# Altium PCB Gear_Trak-v1.0.PcbDoc (part 2 of 5)
Units mil, origin at the board's own origin, x right, y up, seen from the top; angles counter-clockwise.
Board outline 1383 x 2953 mil, 6 copper layers (TOP LAYER, GROUND1, SIGNAL, GROUND2, POWER, BOTTOM LAYER), stack 60.865 mil thick; 166 components, 125 nets, 751 pads, 771 vias.
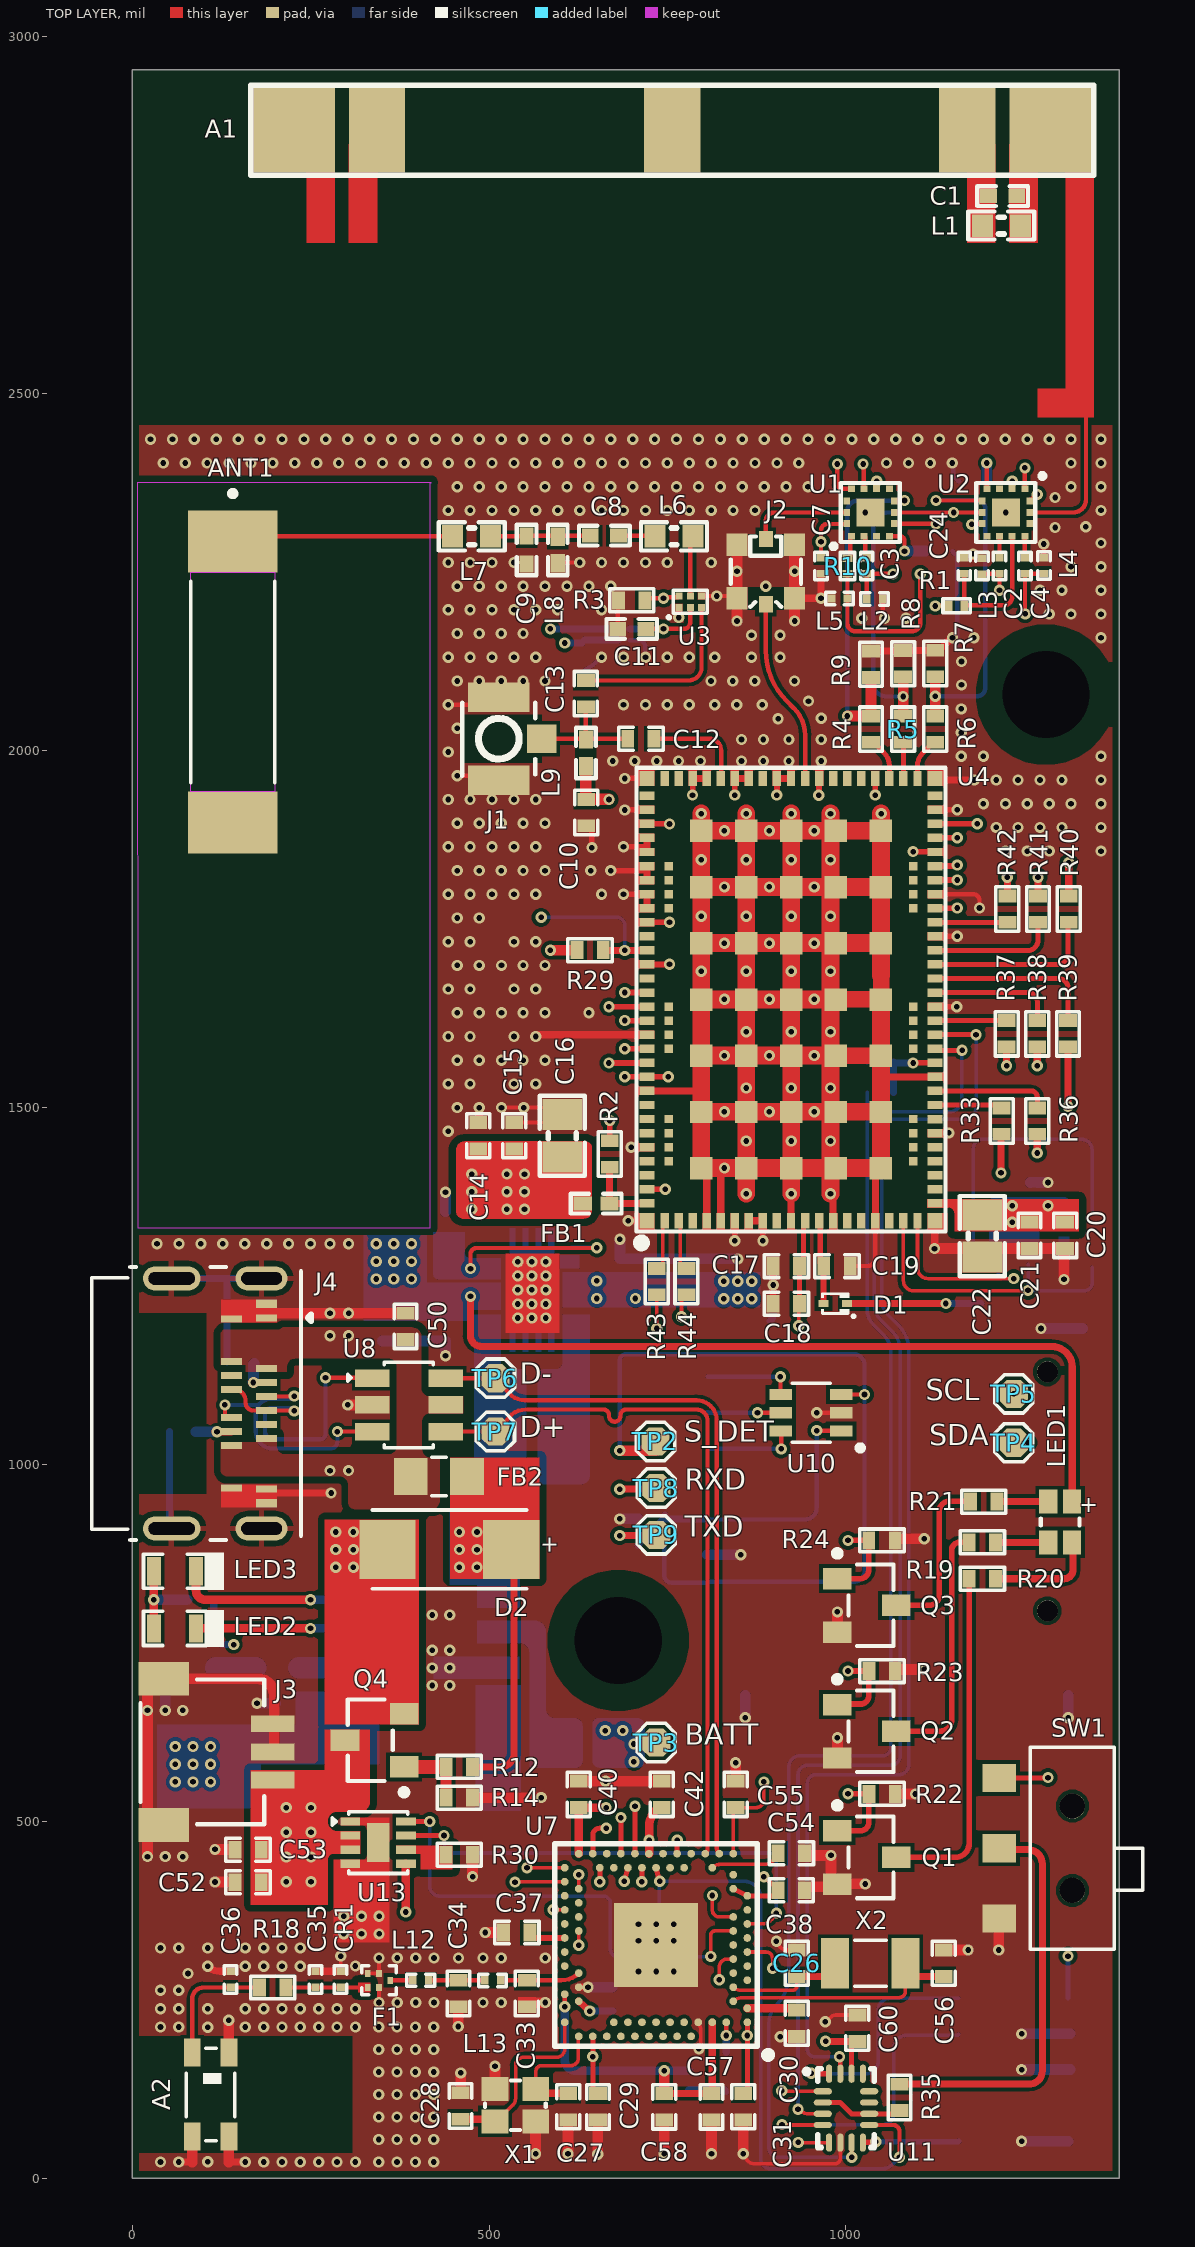
[diagram p0: TOP LAYER view]

## Part data (continued)
CR1: "ESD Suppressor, 30V, 0.04pF", Digikey Part Number=P122037CT-ND, LCSC="Not Available", Manufacturer=Panasonic, Part number IPS=00000004437, Artikkelnr Noca=N.A., Component Class=Semiconductors, ComponentLink1Description=Datasheet, ComponentLink1URL=https://industrial.panasonic.com/cdbs/www-data/pdf/AWD0000/AWD0000C13.pdf, ComponentLink2Description="Supplier link", ComponentLink2URL=N.A., Footprint Doc=0201, HelpURL=N.A., LatestRevisionDate=2020-04-28, Manufacturer Part Number=EZA-EG1N50AC, Note=N.A., Pad Count=2, PartId=101300173, Part Number=EZA-EG1N50AC, Published=2020-02-06, Supplier 1=Digi-Key, Supplier 2=N.A., Supplier Part Number 2=N.A.
D1: "20V schottky barrier diode, Vf 350 mV @ 100 mA, Ir 2.0 µA @ 10 V, If 500 mA", LCSC=C91106, Manufacturer="ON Semiconductor", Package=SOD-923, Part number IPS=00000009952, Supplier Part Number 1=NSR0620P2T5GOSCT-ND, Artikkelnr Noca=10029169, Component Class=Semiconductors, ComponentLink1Description=Datasheet, ComponentLink1URL=N.A., ComponentLink2Description="Supplier link", ComponentLink2URL=N.A., HelpURL=http://www.onsemi.com/pub_link/Collateral/NSR0620P2-D.PDF, LatestRevisionDate=2016-07-07, Manufacturer Part Number=NSR0620P2T5G, Note=N.A., Pad Count=2, PartId=101300131, Part Number=NSR0620P2T5G, Published=2016-07-07, Supplier 1=Digi-Key, Supplier 2=N.A., Supplier Part Number 2=N.A.
D2: library part "D Schottky", "Schottky Diode", LCSC=C22452
F1: "2.4 GHz BPF", LCSC=C910680, Manufacturer=Murata, Part number IPS="00000001784, 80000001660", Supplier Part Number 1=N.A., Artikkelnr Noca=N.A., Component Class=Filters, ComponentLink1Description=Datasheet, ComponentLink1URL=N.A., ComponentLink2Description="Supplier link", ComponentLink2URL=N.A., Footprint Doc=1109, HelpURL=N.A., LatestRevisionDate=2018-05-15, Manufacturer Part Number=SAFFB2G45MA0F0A, Note=N.A., Pad Count=5, PartId=100800023, Part Number=SAFFB2G45MA0F0A, Published=2018-05-15, Supplier 1=N.A., Supplier 2=N.A., Supplier Part Number 2=N.A.
FB1: library part FB0402-120R@100M-700mA, "Ferrite Bead, 120 Ohm @ 100MHz, 700mA, 130 mOhm Max", LCSC=C337873, Manufacturer=Murata, Manufacturer Part Number=BLM15AX121SN1, Package=0402, Part number IPS=00000004487, Supplier Part Number 1=490-5439-1-ND, Artikkelnr Noca=N.A., Component Class=Inductors, ComponentLink1Description=Datasheet, ComponentLink1URL=https://www.murata.com/en-us/products/productdata/8796740059166/ENFA0018.pdf, ComponentLink2Description="Supplier link", ComponentLink2URL=N.A., HelpURL=https://www.murata.com/products/productdetail?partno=BLM15AX121SN1%23, LatestRevisionDate=2020-04-28, Note=N.A., Pad Count=2, PartId=100300100, Part Number=FB0402-120R@100M-700mA, Published=2020-04-28, Supplier 1=Digi-Key, Supplier 2=N.A., Supplier Part Number 2=N.A.
FB2: "FERRITE BEAD 220 OHM 0805 1LN", Case Code (Imperial)=0805, Case Code (Metric)=2012, Current=2A, DC Resistance (DCR)=45mR, LCSC Part Number=C85840, Manufacturer=Murata, Max Operating Temperature=125°C, Min Operating Temperature=-55°C, Package Quantity=1, Test Frequency=100MHz, Tolerance=25%, Case/Package=0805, ComponentLink1Description=https://datasheet.ciiva.com/30514/1845321-30514028.pdf?src-supplier=Jameco, ComponentLink1URL=https://datasheet.ciiva.com/30514/1845321-30514028.pdf?src-supplier=Jameco, ComponentLink2Description=https://datasheet.ciiva.com/1012/l0110s0100blm21p-1012288.pdf?src-supplier=Digikey, ComponentLink2URL=https://datasheet.ciiva.com/1012/l0110s0100blm21p-1012288.pdf?src-supplier=Digikey, ComponentLink3Description=https://datasheet.ciiva.com/11799/0900766b81275e31-11799232.pdf?src-supplier=Rs, ComponentLink3URL=https://datasheet.ciiva.com/11799/0900766b81275e31-11799232.pdf?src-supplier=Rs, ComponentLink4Description=https://datasheet.ciiva.com/29348/442529-da-01-en-chip-drossel-0805-220r-2000ma-2-0x1-25mm-29348007.pdf?src-supplier=Conrad, ComponentLink4URL=https://datasheet.ciiva.com/29348/442529-da-01-en-chip-drossel-0805-220r-2000ma-2-0x1-25mm-29348007.pdf?src-supplier=Conrad, ComponentLink5Description=https://datasheet.ciiva.com/8021/1756152-8021596.pdf?src-supplier=Element14, ComponentLink5URL=https://datasheet.ciiva.com/8021/1756152-8021596.pdf?src-supplier=Element14, ComponentLink6Description=https://datasheet.ciiva.com/8021/1756152-8021598.pdf?src-supplier=Element14, ComponentLink6URL=https://datasheet.ciiva.com/8021/1756152-8021598.pdf?src-supplier=Element14, ComponentLink7Description=https://datasheet.ciiva.com/14122/anblm21p-data-e-14122214.pdf?src-supplier=Distrelec, ComponentLink7URL=https://datasheet.ciiva.com/14122/anblm21p-data-e-14122214.pdf?src-supplier=Distrelec, ComponentLink8Description=https://datasheet.ciiva.com/1012/l0110s0100blm21p-1012287.pdf?src-supplier=Digikey, ComponentLink8URL=https://datasheet.ciiva.com/1012/l0110s0100blm21p-1012287.pdf?src-supplier=Digikey, ComponentLink9Description=https://datasheet.ciiva.com/1012/l0110s0100blm21p-1012289.pdf?src-supplier=Digikey, ComponentLink9URL=https://datasheet.ciiva.com/1012/l0110s0100blm21p-1012289.pdf?src-supplier=Digikey, ComponentLink10Description=https://datasheet.ciiva.com/3081/l0110s0100blm21p-3081655.pdf?src-supplier=Avnet, ComponentLink10URL=https://datasheet.ciiva.com/3081/l0110s0100blm21p-3081655.pdf?src-supplier=Avnet, ComponentLink11Description=https://datasheet.ciiva.com/16215/l0110s0100blm21p-16215194.pdf?src-supplier=Future+Electronics, ComponentLink11URL=https://datasheet.ciiva.com/16215/l0110s0100blm21p-16215194.pdf?src-supplier=Future+Electronics, Core Material=Ferrite, Current Rating=2A, DC Current=2A, DC Resistance-Max=45mR, Depth=1.25mm, Height=0.85mm, Impedance=220R, Item Type="Ferrite Beads", Lead Free="Lead Free", Length=2mm, Manufacturer Part Number=BLM21PG221SN1D, Material=Steel,Ferrite, Max Current Rating=2A, Max DC Current=2A, Military Standard=Not, Number of Lines=1, Packaging="Tape and Reel", Pins=2, Pricing="4000=0.0243, 12000=0.0237, 20000=0.0234, 40000=0.0231, 80000=0.0225 (USD)", Radiation Hardening=No, Reach SVHC Compliant=No, RoHS=Yes, RoHS Compliant=Yes, Series=BLM21P, Stock=612000, Supplier="Future Electronics", Termination=SMD/SMT, Width=1.25mm
J1: library part 20279-001E-03, "Ultraminiature Coaxial Connector, 50 Ohm, SMD", Digikey Part Number=H11891CT-ND, LCSC=NILL, ComponentLink1Description=Datasheet, ComponentLink1URL=\\hizz\pro\app9717\Datasheet\connectors\Wellshow\20279C18.pdf, ComponentLink2Description="Supplier link", ComponentLink2URL=N.A.
J2: library part MM8130-2600, "Coaxial Connector with Switch", LCSC=C167503, ComponentLink1Description=Datasheet, ComponentLink1URL=N.A., ComponentLink2Description="Supplier link", ComponentLink2URL=N.A.
J3: library part SM03B-SRSS-TB, "1.0mm pitch connector side entry SMD", LCSC=C160403, ComponentLink1Description=Datasheet, ComponentLink1URL=N.A., ComponentLink2Description="Supplier link", ComponentLink2URL=N.A.
J4: "USB C RECEPTACLE, 16PIN", Contact Resistance=50mR, Current Rating=5A, Dielectric Material=4303ConductorMaterial, Insulation Resistance=100MR, Manufacturer=Molex, Max Operating Temperature=85°C, Min Operating Temperature=-40°C, Supplier Part Number=538-203615-0003, ComponentLink1Description=https://datasheet.octopart.com/203615-0003-Molex-datasheet-176111458.pdf?src-supplier=Farnell, ComponentLink1URL=https://datasheet.octopart.com/203615-0003-Molex-datasheet-176111458.pdf?src-supplier=Farnell, ComponentLink2Description=https://datasheet.octopart.com/203615-0003-Molex-datasheet-176111458.pdf?src-supplier=Element14, ComponentLink2URL=https://datasheet.octopart.com/203615-0003-Molex-datasheet-176111458.pdf?src-supplier=Element14, Contact Gender=30Gender, Item Type=Connectors, Manufacturer Part Number=203615-0003, Number of Ports=1NUMBER, Number of Rows=2NUMBER, Pins=16NUMBER, Plating Thickness=762nm, Pricing="1=3.44, 10=2.81, 50=2.43, 100=2.29, 1000=2.01, 10000=1.99 (USD)", Reach SVHC Compliant=4188SVHC, RoHS=No, Row Spacing=1.25mm, Shell Finish=153ConductorMaterial, Shell Material=156ConductorMaterial, Stock=9511, Supplier=Mouser, Terminal Pitch=500um
J5: "NanoSIM SMD SIM Card Connectors", Alternate Part Number=SIM8066-6-1-14-01-A, LCSC=C266888, Manufacturer=XUNPU, Manufacturer Part Number=SMN-303, Supplier 1=LCSC
L1: library part L0603-15n-Wirewound-Murata, "Inductor, 700mA, ±5%, 85mΩ, Q=42 @ 250MHz", LCSC=C341693, Package=0603, ComponentLink1Description=Datasheet, ComponentLink1URL=https://search.murata.co.jp/Ceramy/image/img/P02/JELF243A-0026.pdf, ComponentLink2Description="Supplier link", ComponentLink2URL=N.A.
L2: library part L0201-6n2-Wirewound-Murata, "Inductor, 360mA, ±5%, 220mOhm, Q=39", LCSC=C162624, Package=0201, ComponentLink1Description=Datasheet, ComponentLink1URL=https://search.murata.co.jp/Ceramy/image/img/P02/JELF243A-0109.pdf, ComponentLink2Description="Supplier link", ComponentLink2URL=N.A.
L3: library part L0201-6n2-Wirewound-Murata, "Inductor, 360mA, ±5%, 220mOhm, Q=39", LCSC=NILL, Package=0201, ComponentLink1Description=Datasheet, ComponentLink1URL=https://search.murata.co.jp/Ceramy/image/img/P02/JELF243A-0109.pdf, ComponentLink2Description="Supplier link", ComponentLink2URL=N.A.
L4: library part L0201-6n2-Wirewound-Murata, "Inductor, 360mA, ±5%, 220mOhm, Q=39", LCSC=C142508, Package=0201, ComponentLink1Description=Datasheet, ComponentLink1URL=https://search.murata.co.jp/Ceramy/image/img/P02/JELF243A-0109.pdf, ComponentLink2Description="Supplier link", ComponentLink2URL=N.A.
L5: library part L0201-6n2-Wirewound-Murata, "Inductor, 360mA, ±5%, 220mOhm, Q=39", LCSC=C237443, Package=0201, ComponentLink1Description=Datasheet, ComponentLink1URL=https://search.murata.co.jp/Ceramy/image/img/P02/JELF243A-0109.pdf, ComponentLink2Description="Supplier link", ComponentLink2URL=N.A.
L6: library part L0603-8n2-Wirewound-Murata, "Inductor, 800mA, ±0.5nH, 58mΩ, Q=38 @ 250MHz", LCSC=C98087, Manufacturer=Murata, Manufacturer Part Number=LQW18AN8N2D10, Package=0603, Part number IPS=00000003972, Supplier Part Number 1=490-6914-1-ND, Artikkelnr Noca=N.A., Component Class=Inductors, ComponentLink1Description=Datasheet, ComponentLink1URL=https://search.murata.co.jp/Ceramy/image/img/P02/JELF243A-0026.pdf, ComponentLink2Description="Supplier link", ComponentLink2URL=N.A., HelpURL=https://psearch.en.murata.com/inductor/product/LQW18AN8N2D10%23.html, LatestRevisionDate=2019-10-25, Note="-55°C ~ 125°C", Pad Count=2, PartId=100300394, Part Number=L0603-8n2-Wirewound-Murata, Published=2019-10-25, Supplier 1=Digi-Key, Supplier 2=N.A., Supplier Part Number 2=N.A.
L7: library part L0201-6n2-Wirewound-Murata, "Inductor, 360mA, ±5%, 220mOhm, Q=39", Digikey Part Number=490-LQW18AN11NG80DCT-ND, LCSC="Non Stock", Package=0603, ComponentLink1Description=Datasheet, ComponentLink1URL=https://search.murata.co.jp/Ceramy/image/img/P02/JELF243A-0109.pdf, ComponentLink2Description="Supplier link", ComponentLink2URL=N.A.
L8: library part L0201-6n2-Wirewound-Murata, "Inductor, 360mA, ±5%, 220mOhm, Q=39", LCSC=C412266, Package=0402, ComponentLink1Description=Datasheet, ComponentLink1URL=https://search.murata.co.jp/Ceramy/image/img/P02/JELF243A-0109.pdf, ComponentLink2Description="Supplier link", ComponentLink2URL=N.A.
L9: library part L0402-68n-Wirewound-Murata, "Inductor, 140mA, ±2%, 1960mΩ, Q=20", LCSC=C108965, Package=0402, ComponentLink1Description=Datasheet, ComponentLink1URL=https://search.murata.co.jp/Ceramy/image/img/P02/JELF243A-0050.pdf, ComponentLink2Description="Supplier link", ComponentLink2URL=N.A.
L10: library part XFL4020-102MEC, "FIXED IND 1UH 11A 11.9MOHM SM", Case/Package=SMD/SMT, Inductance Tolerance=20%, LCSC Part Number=C5355380, Manufacturer=Coilcraft, Max DC Current=11A, Max Operating Temperature=125°C, Min Operating Temperature=-40°C, Saturation Current=4.5A, Self Resonant Frequency=64MHz, Supplier Part Number=994-XFL4020-102MEC, Test Frequency=100kHz, Category="Fixed Inductors", ComponentLink1Description=https://datasheet.ciiva.com/22679/1682010-22679273.pdf?src-supplier=Element14, ComponentLink1URL=https://datasheet.ciiva.com/22679/1682010-22679273.pdf?src-supplier=Element14, ComponentLink2Description=https://datasheet.ciiva.com/22679/1682010-22679274.pdf?src-supplier=Element14, ComponentLink2URL=https://datasheet.ciiva.com/22679/1682010-22679274.pdf?src-supplier=Element14, ComponentLink3Description=https://datasheet.ciiva.com/13168/xfl4020-13168079.pdf?src-supplier=Mouser, ComponentLink3URL=https://datasheet.ciiva.com/13168/xfl4020-13168079.pdf?src-supplier=Mouser, Core Material=Composite, ESR=11.9mR, Height=2.1mm, Item Type=Inductor, Lead Free="Contains Lead", Length=4.3mm, Manufacturer Part Number=XFL4020-102MEC, Mounting Technology="Surface Mount", Packaging="Tape and Reel", Pricing="1=2.68, 10=2.68, 50=2.68, 100=2.68, 1000=1.01, 10000=1.01 (USD)", Reach SVHC Compliant=No, RMS Current (Irms)=11A, RoHS=Yes, RoHS Compliant=Yes, Series=XFL4020, Shielding=Shielded, Stock=12821, Supplier=Mouser, Termination=SMD/SMT, Tolerance=20%, Width=4.3mm
L11: library part YSPI0520-2R2M, "4A 2.2uH ±20% 32mΩ SMD,5.4x5.2x2mm Power Inductors ROHS", LCSC Part Number=C718375, Manufacturer=YJYCOIN, ComponentLink1Description=LCSC, ComponentLink1URL=https://www.lcsc.com/product-detail/Power-Inductors_YJYCOIN-YSPI0520-2R2M_C718375.html, Item Type=Inductor, Manufacturer Part Number=YSPI0520-2R2M
L12: library part L0201-3n9, "Inductor, 400mA, ±0.1nH", LCSC=C90191, Manufacturer=Murata, Manufacturer Part Number=LQP03TN3N9B02D, Part number IPS=00000001253, Supplier Part Number 1=N.A., Artikkelnr Noca=N.A., Component Class=Inductors, ComponentLink1Description=Datasheet, ComponentLink1URL=N.A., ComponentLink2Description="Supplier link", ComponentLink2URL=N.A., Footprint Doc=0201, HelpURL=N.A., LatestRevisionDate=2017-11-09, Note=N.A., Pad Count=2, PartId=100300022, Part Number=L0201-3n9, Published=2013-04-10, Supplier 1=N.A., Supplier 2=N.A., Supplier Part Number 2=N.A.
L13: library part L0201-4n7, "Inductor, 350mA, ±3%", LCSC=C86126, Package=0201, ComponentLink1Description=Datasheet, ComponentLink1URL=N.A., ComponentLink2Description="Supplier link", ComponentLink2URL=N.A.
L14: library part LQG15HN15NJ02D, "FIXED IND 15NH 400MA 0.45OHM SMD", Case Code (Imperial)=0402, Case Code (Metric)=1005, Current Rating=300mA, DC Resistance (DCR)=460mR, Inductance Tolerance=5%, LCSC Part Number=C97979, Manufacturer=Murata, Max Operating Temperature=125°C, Min Operating Temperature=-55°C, Package Quantity=1, Self Resonant Frequency=2.3GHz, Test Frequency=100MHz, Case/Package=0402, ComponentLink1Description=https://datasheet.ciiva.com/11801/0900766b80f10808-11801397.pdf?src-supplier=Rs, ComponentLink1URL=https://datasheet.ciiva.com/11801/0900766b80f10808-11801397.pdf?src-supplier=Rs, ComponentLink2Description=https://datasheet.ciiva.com/8002/66026-8002488.pdf?src-supplier=Element14, ComponentLink2URL=https://datasheet.ciiva.com/8002/66026-8002488.pdf?src-supplier=Element14, ComponentLink3Description=https://datasheet.ciiva.com/29696/l0075s0083lqg15hn-29696702.pdf?src-supplier=Digikey, ComponentLink3URL=https://datasheet.ciiva.com/29696/l0075s0083lqg15hn-29696702.pdf?src-supplier=Digikey, ComponentLink4Description=https://datasheet.ciiva.com/1063/l0075s0083lqg15hn-1063850.pdf?src-supplier=Digikey, ComponentLink4URL=https://datasheet.ciiva.com/1063/l0075s0083lqg15hn-1063850.pdf?src-supplier=Digikey, ComponentLink5Description=https://datasheet.ciiva.com/29696/l0075s0083lqg15hn-29696703.pdf?src-supplier=Digikey, ComponentLink5URL=https://datasheet.ciiva.com/29696/l0075s0083lqg15hn-29696703.pdf?src-supplier=Digikey, Core Material=Air, DC Current=300mA, Depth=0.55mm, ESR=450mR, Height=0.5mm, Height - Seated (Max)=0.022inch, Item Type=Inductor, Length=0.039inch, Manufacturer Part Number=LQG15HN15NJ02D, Max Current Rating=300mA, Max DC Current=300mA, Military Standard=Not, Mounting Technology="Surface Mount", Packaging="Tape and Reel", Pricing="1=0.1, 10=0.037, 50=0.037, 100=0.029, 1000=0.022, 10000=0.018 (USD)", Q Factor=8, Reach SVHC Compliant=No, RoHS=Yes, RoHS Compliant=Yes, Series=LQG15HS, Shielding=Unshielded, Stock=45308, Supplier=Mouser, Termination=SMD/SMT, Tolerance=5%, Width=0.02inch
L15: library part MLZ1608M100WT000, "FIXED IND 10UH 250MA 1.05OHM SMD", Case Code (Imperial)=0603, Case Code (Metric)=1608, Current Rating=250mA, DC Resistance (DCR)=1.365R, LCSC Part Number=C76798, Manufacturer=TDK, Max Operating Temperature=125°C, Min Operating Temperature=-55°C, Package Quantity=4000, Saturation Current=90mA, Self Resonant Frequency=50MHz, Test Frequency=2MHz, Tolerance=20%, Case/Package=0603, ComponentLink1Description=https://product.tdk.com/info/en/catalog/datasheets/inductor_commercial_decoupling_mlz1608_en.pdf?src-supplier=Digikey, ComponentLink1URL=https://product.tdk.com/info/en/catalog/datasheets/inductor_commercial_decoupling_mlz1608_en.pdf?src-supplier=Digikey, ComponentLink2Description=https://datasheet.octopart.com/MLZ1608M100WT000-TDK-datasheet-12356712.pdf?src-supplier=Newark, ComponentLink2URL=https://datasheet.octopart.com/MLZ1608M100WT000-TDK-datasheet-12356712.pdf?src-supplier=Newark, ComponentLink3Description=https://datasheet.octopart.com/MLZ1608M100WT000-TDK-datasheet-38159369.pdf?src-supplier=Future+Electronics, ComponentLink3URL=https://datasheet.octopart.com/MLZ1608M100WT000-TDK-datasheet-38159369.pdf?src-supplier=Future+Electronics, Core Material=Ferrite, ESR=1.05R, Height=950um, Height - Seated (Max)=0.037inch, Item Type=Inductors, Length=0.063inch, Manufacturer Part Number=MLZ1608M100WT000, Mounting Technology="Surface Mount", Packaging="Cut Tape", Pricing="1=0.14, 10=0.09, 25=0.0804, 50=0.0706, 100=0.0617, 250=0.05292 (USD)", RMS Current (Irms)=250mA, RoHS=Yes, RoHS Compliant=Yes, Series=MLZ, Shielding=Shielded, Stock=146199, Supplier=Digikey, Width=0.031inch
LED1: library part LTST-C19HE1WT, LCSC=C458749
LED2: library part NCD0603G2, "Emerald 0603 Light Emitting Diodes (LED) ROHS", LCSC Part Number=C87326, Manufacturer="Foshan NationStar Optoelectronics", Package=0603, ComponentLink1Description=LCSC, ComponentLink1URL=https://www.lcsc.com/product-detail/Light-Emitting-Diodes-LED_Foshan-NationStar-Optoelectronics-NCD0603G2_C87326.html, Item Type=LED, Manufacturer Part Number=NCD0603G2
LED3: library part NCD0603R3, "RED LED 0603 Light Emitting Diodes", LCSC Part Number=C3151730, Manufacturer="Foshan NationStar Optoelectronics", Package=0603, ComponentLink1Description=LCSC, ComponentLink1URL=https://www.lcsc.com/product-detail/Light-Emitting-Diodes-LED_Foshan-NationStar-Optoelectronics-NCD0603R3_C3151730.html, Item Type=LED, Manufacturer Part Number=NCD0603R3
P1: "CONN RCPT 10POS 0.05 GOLD SMD", Color=46Colour, Contact Resistance=30mR, Current Rating=1A, Insulation Resistance=100MR, LCSC Part Number=C598542, Manufacturer="Amphenol Communications Solutions", Max Operating Temperature=125°C, Max Voltage Rating (AC)=125V, Min Operating Temperature=-55°C, ComponentLink1Description=https://datasheet.octopart.com/20021321-00010C4LF-FCI-datasheet-27119701.pdf?src-supplier=Newark, ComponentLink1URL=https://datasheet.octopart.com/20021321-00010C4LF-FCI-datasheet-27119701.pdf?src-supplier=Newark, ComponentLink2Description=https://datasheet.octopart.com/20021321-00010C4LF-Amphenol-Communications-Solutions-datasheet-98396828.pdf?src-supplier=Element14, ComponentLink2URL=https://datasheet.octopart.com/20021321-00010C4LF-Amphenol-Communications-Solutions-datasheet-98396828.pdf?src-supplier=Element14, ComponentLink3Description=https://datasheet.octopart.com/20021321-00010C4LF-FCI-datasheet-21379677.pdf?src-supplier=Farnell, ComponentLink3URL=https://datasheet.octopart.com/20021321-00010C4LF-FCI-datasheet-21379677.pdf?src-supplier=Farnell, ComponentLink4Description=https://datasheet.octopart.com/20021321-00010C4LF-Amphenol-Communications-Solutions-datasheet-100449241.pdf?src-supplier=TME, ComponentLink4URL=https://datasheet.octopart.com/20021321-00010C4LF-Amphenol-Communications-Solutions-datasheet-100449241.pdf?src-supplier=TME, Connector Type=4640ConnectorType, Contact Material=153,157ConductorMaterial, Contact Plating=157ConductorMaterial, Depth=3mm, Gender=4472Gender, Height=4.75mm, Housing Color=46Colour, Housing Material=4896ConductorMaterial, Item Type="Headers and Wire Housings", Lead Free=5697LeadFree, Length=13.16mm, Manufacturer Part Number=20021321-00010C4LF, Mounting Technology=8Mount, Number of Contacts=10NUMBER, Number of Positions=10NUMBER, Number of Rows=2NUMBER, Packaging=10Packaging, Pins=10NUMBER, Pitch=1.27mm, Pricing="1=1.13, 10=0.963, 100=0.8184 (USD)", Reach SVHC Compliant=4186SVHC, RoHS=No, Row Spacing=1.27mm, Stack Height=4.3mm, Stock=9747, Supplier=Digikey, Termination=4558ConnectorType, Voltage Rating=125V
Q1 Q2 Q3: library part NMOS-2, "30V 5.8A 35mΩ@10V,5.8A 350mW N Channel SOT-23 MOSFETs ROHS", LCSC=C181090, ComponentLink1Description="Manufacturer Link", ComponentLink1URL=http://www.irf.com/
Q4: library part PMOS-2, "P-Channel Power MOSFET", LCSC=C6903, ComponentLink1Description="Manufacturer Link", ComponentLink1URL=http://www.irf.com/
R1 R10: library part RC0201JR-070RL, "RES SMD 0 OHM JUMPER 1/20W 0201", Case Code (Imperial)=0201, Case Code (Metric)=0603, LCSC Part Number=C106228, Manufacturer=Yageo, Max Operating Temperature=125°C, Max Power Dissipation=50mW, Min Operating Temperature=-55°C, Package Quantity=10000, Resistance Tolerance=5%, Resistor Type="Thick Film", Supplier Part Number 1=311-0.0NCT-ND, Voltage Rating=25V, Case/Package=0201, Category="Chip SMD Resistors", ComponentLink1Description=https://datasheet.ciiva.com/7672/1563626-7672247.pdf?src-supplier=Element14, ComponentLink1URL=https://datasheet.ciiva.com/7672/1563626-7672247.pdf?src-supplier=Element14, ComponentLink2Description=https://datasheet.ciiva.com/7660/1421516-7660808.pdf?src-supplier=Element14, ComponentLink2URL=https://datasheet.ciiva.com/7660/1421516-7660808.pdf?src-supplier=Element14, ComponentLink3Description=https://datasheet.ciiva.com/7672/1563626-7672248.pdf?src-supplier=Element14, ComponentLink3URL=https://datasheet.ciiva.com/7672/1563626-7672248.pdf?src-supplier=Element14, ComponentLink4Description=https://datasheet.ciiva.com/16855/pyu-rc0201-51-rohs-l-8-16855994.pdf?src-supplier=Avnet+Europe, ComponentLink4URL=https://datasheet.ciiva.com/16855/pyu-rc0201-51-rohs-l-8-16855994.pdf?src-supplier=Avnet+Europe, ComponentLink5Description=https://datasheet.ciiva.com/28419/pyu-rc0201-51-rohs-l-8-28419660.pdf?src-supplier=Avnet+Europe, ComponentLink5URL=https://datasheet.ciiva.com/28419/pyu-rc0201-51-rohs-l-8-28419660.pdf?src-supplier=Avnet+Europe, ComponentLink6Description=https://datasheet.ciiva.com/46391/1421516-46391340.pdf?src-supplier=Element14, ComponentLink6URL=https://datasheet.ciiva.com/46391/1421516-46391340.pdf?src-supplier=Element14, ComponentLink7Description=https://datasheet.ciiva.com/8896/pyu-rc0201-51-rohs-l-8-8896143.pdf?src-supplier=Avnet, ComponentLink7URL=https://datasheet.ciiva.com/8896/pyu-rc0201-51-rohs-l-8-8896143.pdf?src-supplier=Avnet, Construction=Rectangular, Contact Plating=Tin,Matte, Depth=0.3mm, Features="Moisture Resistant", Height=0.01inch, Lead Free="Lead Free", Length=0.6mm, Manufacturer Part Number=RC0201JR-070RL, Military Standard=Not, Number of Terminations=2, Packaging="Tape and Reel", Power Rating=50mW, Pricing 1="1=0.10000, 10=0.03600, 25=0.02640, 50=0.02000, 100=0.01480, 250=0.01128, 500=0.00904, 1000=0.00665, 5000=0.00477 (USD)", Radiation Hardening=No, REACH SVHC=Unknown, Resistance=0R, RoHS=Yes, RoHS Compliant=Yes, Series=RC, Size Code=0201, Stock 1=11079, Supplier 1=Digi-Key, Termination=SMD/SMT, Tolerance=5%, Voltage Rating (DC)=25V, Weight=6E-06oz, Width=0.012inch
R2 R29 R30: library part RC0402FR-0710KL, "RES 10K OHM 1% 1/16W 0402", Case Code (Imperial)=0402, Case Code (Metric)=1005, LCSC Part Number=C60490, Manufacturer=Yageo, Max Operating Temperature=155°C, Max Power Dissipation=63mW, Min Operating Temperature=-55°C, Power Rating=62.5mW, Resistance=10kR, Resistance Tolerance=1%, Resistor Type="Thick Film", Supplier Part Number 1=603-RC0402FR-0710KL, Temperature Coefficient=100ppm/°C, Voltage Rating=50V, Case/Package=0402, Category="Chip SMD Resistors", ComponentLink1Description=https://datasheet.ciiva.com/7660/38568-7660787.pdf?src-supplier=Element14, ComponentLink1URL=https://datasheet.ciiva.com/7660/38568-7660787.pdf?src-supplier=Element14, ComponentLink2Description=https://datasheet.ciiva.com/7849/1686128-7849814.pdf?src-supplier=Element14, ComponentLink2URL=https://datasheet.ciiva.com/7849/1686128-7849814.pdf?src-supplier=Element14, ComponentLink3Description=https://datasheet.ciiva.com/7983/1018594-7983486.pdf?src-supplier=Element14, ComponentLink3URL=https://datasheet.ciiva.com/7983/1018594-7983486.pdf?src-supplier=Element14, ComponentLink4Description=https://datasheet.ciiva.com/22747/1018594-22747512.pdf?src-supplier=Element14, ComponentLink4URL=https://datasheet.ciiva.com/22747/1018594-22747512.pdf?src-supplier=Element14, ComponentLink5Description=https://datasheet.ciiva.com/12667/pyu-rc0402-51-rohs-l-6-r-12667067.pdf?src-supplier=Mouser, ComponentLink5URL=https://datasheet.ciiva.com/12667/pyu-rc0402-51-rohs-l-6-r-12667067.pdf?src-supplier=Mouser, ComponentLink6Description=https://datasheet.ciiva.com/7849/1784430-7849813.pdf?src-supplier=Element14, ComponentLink6URL=https://datasheet.ciiva.com/7849/1784430-7849813.pdf?src-supplier=Element14, ComponentLink7Description=https://datasheet.ciiva.com/7849/1784430-7849815.pdf?src-supplier=Element14, ComponentLink7URL=https://datasheet.ciiva.com/7849/1784430-7849815.pdf?src-supplier=Element14, Construction=Rectangular, Depth=0.5mm, Features="Moisture Resistant", Height=0.32mm, Item Type=Resistor, Lead Free="Lead Free", Lead Pitch=0.2mm, Length=1mm, Manufacturer Part Number=RC0402FR-0710KL, Military Standard=Not, Number of Pins=2, Number of Terminations=2, Packaging="Tape and Reel", Pricing 1="1=0.10000, 10=0.01400, 50=0.01400, 100=0.00500, 1000=0.00300, 10000=0.00200 (USD)", REACH SVHC="No SVHC", RoHS=Yes, RoHS Compliant=Yes, Series=RC, Stock 1=18648329, Supplier 1=Mouser, Termination=SMD/SMT, Tolerance=1%, Voltage Rating (DC)=50V, Width=0.5mm, Working Voltage=50V
R3 R14 R17 R22 R23 R24 R34 R35: library part RC0402FR-07100KL, "RES 100K OHM 1% 1/16W 0402", Case Code (Imperial)=0402, Case Code (Metric)=1005, LCSC Part Number=C60491, Manufacturer=Yageo, Max Operating Temperature=155°C, Max Power Dissipation=63mW, Min Operating Temperature=-55°C, Package Quantity=1, Resistance=100kR, Resistance Tolerance=1%, Resistor Type="Thick Film", Supplier Part Number 1=603-RC0402FR-07100KL, Temperature Coefficient=100ppm/°C, Voltage Rating=50V, Case/Package=0402, Category="Chip SMD Resistors", ComponentLink1Description=https://datasheet.ciiva.com/11819/0900766b80c66297-11819452.pdf?src-supplier=RSComponents, ComponentLink1URL=https://datasheet.ciiva.com/11819/0900766b80c66297-11819452.pdf?src-supplier=RSComponents, ComponentLink2Description=https://datasheet.ciiva.com/22747/1018594-22747509.pdf?src-supplier=Element14, ComponentLink2URL=https://datasheet.ciiva.com/22747/1018594-22747509.pdf?src-supplier=Element14, ComponentLink3Description=https://datasheet.ciiva.com/2453/pyu-r-int-thick-7-2453362.pdf?src-supplier=Digi-Key, ComponentLink3URL=https://datasheet.ciiva.com/2453/pyu-r-int-thick-7-2453362.pdf?src-supplier=Digi-Key, ComponentLink4Description=https://datasheet.ciiva.com/2453/pyu-r-int-thick-7-2453363.pdf?src-supplier=Digi-Key, ComponentLink4URL=https://datasheet.ciiva.com/2453/pyu-r-int-thick-7-2453363.pdf?src-supplier=Digi-Key, ComponentLink5Description=https://datasheet.ciiva.com/2453/pyu-r-int-thick-7-2453361.pdf?src-supplier=Digi-Key, ComponentLink5URL=https://datasheet.ciiva.com/2453/pyu-r-int-thick-7-2453361.pdf?src-supplier=Digi-Key, ComponentLink6Description=https://datasheet.ciiva.com/12667/pyu-rc0402-51-rohs-l-6-r-12667930.pdf?src-supplier=Mouser, ComponentLink6URL=https://datasheet.ciiva.com/12667/pyu-rc0402-51-rohs-l-6-r-12667930.pdf?src-supplier=Mouser, ComponentLink7Description=https://datasheet.ciiva.com/15189/getdatasheetpartid-323696-15189334.pdf?src-supplier=Verical, ComponentLink7URL=https://datasheet.ciiva.com/15189/getdatasheetpartid-323696-15189334.pdf?src-supplier=Verical, Construction=Rectangular, Depth=0.5mm, Features="Moisture Resistant", Height=0.016inch, Item Type=Resistor, Lead Free="Lead Free", Length=0.039inch, Manufacturer Part Number=RC0402FR-07100KL, Military Standard=Not, Number of Terminations=2, Packaging="Tape and Reel", Power Rating=63mW, Pricing 1="1=0.10000, 10=0.01200, 50=0.01200, 100=0.00500, 1000=0.00300, 2500=0.00200, 10000=0.00100 (USD)", REACH SVHC="No SVHC", RoHS=Yes, RoHS Compliant=Yes, Series=RC, Stock 1=7759549, Supplier 1=Mouser, Technology="THICK FILM", Termination=SMD/SMT, Tolerance=1%, Width=0.02inch, Working Voltage=50V
R4 R5 R6 R13 R25: library part RC0402FR-071KL, "RES 1K OHM 1% 1/16W 0402", Case Code (Imperial)=0402, Case Code (Metric)=1005, LCSC Part Number=C106235, Manufacturer=Yageo, Max Operating Temperature=155°C, Max Power Dissipation=63mW, Min Operating Temperature=-55°C, Power Rating=62.5mW, Resistance=1kR, Resistance Tolerance=1%, Resistor Type="Thick Film", Temperature Coefficient=100ppm/°C, Voltage Rating=50V, Case/Package=0402, Category="Chip SMD Resistors", ComponentLink1Description=https://datasheet.ciiva.com/11819/0900766b80c66297-11819477.pdf?src-supplier=RSComponents, ComponentLink1URL=https://datasheet.ciiva.com/11819/0900766b80c66297-11819477.pdf?src-supplier=RSComponents, ComponentLink2Description=https://datasheet.ciiva.com/7983/1018594-7983502.pdf?src-supplier=Element14, ComponentLink2URL=https://datasheet.ciiva.com/7983/1018594-7983502.pdf?src-supplier=Element14, ComponentLink3Description=https://datasheet.ciiva.com/22747/1018594-22747513.pdf?src-supplier=Element14, ComponentLink3URL=https://datasheet.ciiva.com/22747/1018594-22747513.pdf?src-supplier=Element14, ComponentLink4Description=https://datasheet.ciiva.com/12666/pyu-rc0402-51-rohs-l-6-r-12666741.pdf?src-supplier=Mouser, ComponentLink4URL=https://datasheet.ciiva.com/12666/pyu-rc0402-51-rohs-l-6-r-12666741.pdf?src-supplier=Mouser, ComponentLink5Description=https://datasheet.ciiva.com/7849/1018594-7849869.pdf?src-supplier=Element14, ComponentLink5URL=https://datasheet.ciiva.com/7849/1018594-7849869.pdf?src-supplier=Element14, ComponentLink6Description=https://datasheet.ciiva.com/7849/1018594-7849871.pdf?src-supplier=Element14, ComponentLink6URL=https://datasheet.ciiva.com/7849/1018594-7849871.pdf?src-supplier=Element14, ComponentLink7Description=https://datasheet.ciiva.com/17063/pyu-rc0402-51-rohs-l-6-r-17063193.pdf?src-supplier=Future+Electronics, ComponentLink7URL=https://datasheet.ciiva.com/17063/pyu-rc0402-51-rohs-l-6-r-17063193.pdf?src-supplier=Future+Electronics, Construction=Rectangular, Depth=0.5mm, Features="Moisture Resistant", Height=0.32mm, Item Type=Resistor, Lead Free="Lead Free", Length=1mm, Manufacturer Part Number=RC0402FR-071KL, Military Standard=Not, Number of Pins=2, Number of Terminations=2, Packaging="Tape and Reel", Pricing 1="10000=0.00085, 20000=0.00087, 40000=0.00084, 60000=0.00083, 80000=0.00079, 100000=0.00078, 1000000=0.00076 (USD)", Reach SVHC Compliant=Yes, RoHS=Yes, RoHS Compliant=Yes, Series=RC, Size Code=0402, Stock 1=13030000, Supplier 1=Avnet, Supplier Part Number 1=RC0402FR-071KL, Technology="THICK FILM", Termination=SMD/SMT, Tolerance=1%, Voltage Rating (DC)=50V, Width=0.5mm
R7 R8 R9: library part RC0402FR-071ML, "RES 1M OHM 1% 1/16W 0402", Case Code (Imperial)=0402, Case Code (Metric)=1005, LCSC Part Number=C138033, Manufacturer=Yageo, Max Operating Temperature=155°C, Max Power Dissipation=63mW, Min Operating Temperature=-55°C, Resistance Tolerance=1%, Resistor Type="Thick Film", Supplier Part Number=311-1.00MLRCT-ND, Temperature Coefficient=100ppm/°C, Voltage Rating=50V, Case/Package=0402, Category="Chip SMD Resistors", ComponentLink1Description=https://datasheet.ciiva.com/11808/0900766b80c66297-11808125.pdf?src-supplier=Rs, ComponentLink1URL=https://datasheet.ciiva.com/11808/0900766b80c66297-11808125.pdf?src-supplier=Rs, ComponentLink2Description=https://datasheet.ciiva.com/46394/1018594-46394951.pdf?src-supplier=Element14, ComponentLink2URL=https://datasheet.ciiva.com/46394/1018594-46394951.pdf?src-supplier=Element14, ComponentLink3Description=https://datasheet.ciiva.com/7849/1018594-7849883.pdf?src-supplier=Element14, ComponentLink3URL=https://datasheet.ciiva.com/7849/1018594-7849883.pdf?src-supplier=Element14, ComponentLink4Description=https://datasheet.ciiva.com/7849/1018594-7849882.pdf?src-supplier=Element14, ComponentLink4URL=https://datasheet.ciiva.com/7849/1018594-7849882.pdf?src-supplier=Element14, ComponentLink5Description=https://datasheet.ciiva.com/16741/pyu-rc0402-51-rohs-l-6-r-16741081.pdf?src-supplier=Future+Electronics, ComponentLink5URL=https://datasheet.ciiva.com/16741/pyu-rc0402-51-rohs-l-6-r-16741081.pdf?src-supplier=Future+Electronics, Construction=Rectangular, Depth=0.5mm, Features="Moisture Resistant", Height=0.32mm, Item Type=Resistor, Lead Free=5697LeadFree, Length=1mm, Manufacturer Part Number=RC0402FR-071ML, Military Standard=Not, Number of Terminations=2, Packaging="Tape and Reel", Power Rating=63mW, Pricing="1=0.1, 10=0.015, 50=0.0088, 100=0.0073, 500=0.00488, 1000=0.00417, 5000=0.00297 (USD)", Reach SVHC Compliant=Unknown, RoHS=Yes, RoHS Compliant=Yes, Series=RC, Stock=6516, Supplier=Digikey, Technology="THICK FILM", Termination=SMD/SMT, Tolerance=1%, Voltage Rating (AC)=50V
R11 R33 R36 R37 R38 R39 R40 R41 R42: library part RC0402FR-070RL, "RES 0 OHM JUMPER 1/16W 0402", Case Code (Imperial)=0402, Case Code (Metric)=1005, LCSC Part Number=C106231, Manufacturer=Yageo, Max Operating Temperature=155°C, Max Power Dissipation=63mW, Min Operating Temperature=-55°C, Power Rating=62.5mW, Resistance=0R, Resistor Type="Thick Film", Supplier Part Number 1=603-RC0402FR-070RL, Temperature Coefficient=200ppm/°C, Tolerance=1%, Voltage Rating=50V, Case/Package=0402, ComponentLink1Description=https://datasheet.ciiva.com/8896/pyu-rc0402-51-rohs-l-6-8896149.pdf?src-supplier=Avnet, ComponentLink1URL=https://datasheet.ciiva.com/8896/pyu-rc0402-51-rohs-l-6-8896149.pdf?src-supplier=Avnet, ComponentLink2Description=https://datasheet.ciiva.com/16790/pyu-rc0402-51-rohs-l-6-r-16790444.pdf?src-supplier=Future+Electronics, ComponentLink2URL=https://datasheet.ciiva.com/16790/pyu-rc0402-51-rohs-l-6-r-16790444.pdf?src-supplier=Future+Electronics, Contact Plating=Tin,Matte, Features="Moisture Resistant", Height=0.35mm, Item Type=Resistors, Lead Free="Lead Free", Length=1mm, Manufacturer Part Number=RC0402FR-070RL, Mount="Surface Mount", Number of Terminations=2, Packaging="Tape and Reel", Pricing 1="1=0.10000, 10=0.01400, 50=0.01400, 100=0.00600, 1000=0.00300, 5000=0.00200, 10000=0.00100 (USD)", Radiation Hardening=No, RoHS=Yes, RoHS Compliant=Yes, Series=RC, Size Code=0402, Stock 1=8556842, Supplier 1=Mouser, Termination=SMD/SMT, Width=0.5mm
R12: library part RC0402FR-0747KL, "RES 47K OHM 1% 1/16W 0402", Case Code (Imperial)=0402, Case Code (Metric)=1005, LCSC Part Number=C93943, Manufacturer=Yageo, Max Operating Temperature=155°C, Max Power Dissipation=63mW, Min Operating Temperature=-55°C, Package Quantity=1, Power Rating=62.5mW, Resistance=47kR, Resistance Tolerance=1%, Resistor Type="Thick Film", Temperature Coefficient=100ppm/°C, Voltage Rating=50V, Case/Package=0402, Category="Chip SMD Resistors", ComponentLink1Description=https://datasheet.ciiva.com/46412/1018594-46412839.pdf?src-supplier=Element14, ComponentLink1URL=https://datasheet.ciiva.com/46412/1018594-46412839.pdf?src-supplier=Element14, ComponentLink2Description=https://datasheet.ciiva.com/2453/pyu-r-int-thick-7-2453389.pdf?src-supplier=Digi-Key, ComponentLink2URL=https://datasheet.ciiva.com/2453/pyu-r-int-thick-7-2453389.pdf?src-supplier=Digi-Key, ComponentLink3Description=https://datasheet.ciiva.com/2453/pyu-r-int-thick-7-2453390.pdf?src-supplier=Digi-Key, ComponentLink3URL=https://datasheet.ciiva.com/2453/pyu-r-int-thick-7-2453390.pdf?src-supplier=Digi-Key, ComponentLink4Description=https://datasheet.ciiva.com/2453/pyu-r-int-thick-7-2453388.pdf?src-supplier=Digi-Key, ComponentLink4URL=https://datasheet.ciiva.com/2453/pyu-r-int-thick-7-2453388.pdf?src-supplier=Digi-Key, ComponentLink5Description=https://datasheet.ciiva.com/15189/getdatasheetpartid-323748-15189466.pdf?src-supplier=Verical, ComponentLink5URL=https://datasheet.ciiva.com/15189/getdatasheetpartid-323748-15189466.pdf?src-supplier=Verical, ComponentLink6Description=https://datasheet.ciiva.com/16793/pyu-rc0402-51-rohs-l-6-r-16793430.pdf?src-supplier=Future+Electronics, ComponentLink6URL=https://datasheet.ciiva.com/16793/pyu-rc0402-51-rohs-l-6-r-16793430.pdf?src-supplier=Future+Electronics, Construction=Rectangular, Depth=0.5mm, Features="Moisture Resistant", Height=0.016inch, Item Type=Resistor, Lead Free="Lead Free", Length=1mm, Manufacturer Part Number=RC0402FR-0747KL, Military Standard=Not, Number of Terminations=2, Packaging="Tape and Reel", Pricing 1="10000=0.00085, 20000=0.00087, 40000=0.00084, 60000=0.00083, 80000=0.00079, 100000=0.00078, 1000000=0.00076 (USD)", RoHS=Yes, RoHS Compliant=Yes, Series=RC, Size Code=0402, Stock 1=680000, Supplier 1=Avnet, Supplier Part Number 1=RC0402FR-0747KL, Termination=SMD/SMT, Tolerance=1%, Width=0.02inch